# Altium PCB Secondary-PCB-v1.1.PcbDoc
Units mil, origin at the board's own origin, x right, y up, seen from the top; angles counter-clockwise.
Board outline 354.04 x 590.55 mil, 2 copper layers (Top Layer, Bottom Layer), stack 57 mil thick; 2 components, 1 nets, 2 pads, 0 vias.
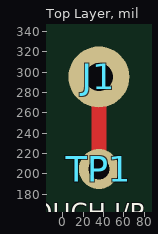
[diagram p0: Top Layer view]
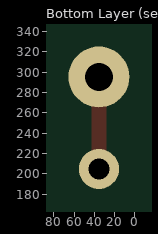
[diagram p1: Bottom Layer view, seen from below]

## Layer stack, top to bottom
Top Solder: solder mask 3, Solder Resist, Dk 3.5
Top Layer: signal copper 10
Dielectric 1: dielectric 37, FR-4, Dk 4.8
Bottom Layer: signal copper 10
Bottom Solder: solder mask 3, Solder Resist, Dk 3.5

## Board outline
-33.41,132.06 cw(c35.49,295.28) -33.41,458.5 -33.41,531.5 cw(c35.49,531.5) 0,590.55 70.98,590.55 cw(c35.49,531.5) 104.39,531.5 104.39,458.5 cw(c35.49,295.28) 104.39,132.06 104.39,59.06 cw(c35.49,59.05) 70.98,0 0,0 cw(c35.49,59.05) -33.41,59.06

## Design rules (kind name [scope] priority, off if disabled: settings)
Clearance [All] p1: gap=10 ignorepadtopadclearanceinfootprint=FALSE except(0: Arc-Hole Track-Hole SMDPad-Hole THPad-Hole Via-Hole Fill-Hole Poly-Hole Region-Hole Text-Hole)
PolygonConnect [All] p1: connectstyle=Relief reliefconductorwidth=10 reliefentries=4 polygonreliefangle="90 Angle" airgapwidth=10
RoutingVias [All] p1: holewidth=28 width=50 viastyle="Through Hole" minholewidth=28 minwidth=50 maxholewidth=28 maxwidth=50
SilkToSilkClearance [All] p1: silktosilkclearance=0
SilkToSolderMaskClearance [IsPad] p1: minsilkscreentomaskgap=0 clearancetoexposedcopper=TRUE
SolderMaskExpansion [All] p1: expansion=4 istentingtop=FALSE
Width [All] p1: maxlimit=100 minlimit=10 preferedwidth=10
28 further rules are at their usual default settings.

## Classes and differential pairs
component class Touch-Button-Sheet: J1

## Components (designator, comment, footprint, x,y, rotation, side; value= is the part's Value field where it differs from the comment)
J1 "F9-10-5.5Z" F9-10-5.5Z 35.49,295.28 r0 top
TP1 "0.5mm Test Pad" "0.5mm Test Pad" 35.49,204.65 r90 top

## Footprints (in the part's own frame and the unit in brackets; to place one, negate y for a bottom-side part, rotate by r counter-clockwise, add the part's x,y. Pads: shape width x height; smd on the part's side, far side on the other; paste and mask are expansions set on the pad)
"0.5mm Test Pad" [mm]
  round 1 hole 0.52: 1(0,0)
F9-10-5.5Z [mil]
  round 60 hole 27.56: 1(0,0)
  body extent -168,-176 185,159, height 362

## Part data
J1: "Press spring", LCSC Part Number=C5143797, Manufacturer=Sam&wing, Package=Custom, ComponentLink1Description=LCSC, ComponentLink1URL=https://www.lcsc.com/product-detail/Press-spring_Sam-wing-F9-10-5-5Z_C5143797.html, Item Type="Press spring", Manufacturer Part Number=F9-10-5.5Z
TP1: "Test pad"

## Nets (pads, with @x,y where several pads share a name; then routed paths per layer and width w, separated by ;. In a path a pad name is that pad's centre, name@x,y a point inside that pad or via, vN(x,y) a via of type N, cw(c..) or ccw(c..) an arc to the next point about the centre after c; other vN are vias at no path point)
TOUCH_I/P: J1.1 TP1.1 | length 90.6
  Top Layer w15: TP1.1 J1.1

## Silkscreen, mask and mechanical layers (free items; w line width, h text height)
Top Overlay:
  circle w10: c35.49,295.28 r177.63
  text "TOUCH I/P" at -44.23,147.35 h30
Dimension:
  circle w10: c35.49,295.28 r149.61
Board_Outline:
  the board outline again, w10

## Dimensions
-141.68,295.28 to 212.65,295.28 on Dimension